# Allegro board 980XS-I6K51D-11120_placement.brd

Outline 581.66 x 429.26 mm; copper layers: TOP, L02_GND, L03_DPS, L04_GND, L05_DPS, L06_GND, L07_DPS, L08_GND, L09_DPS, L10_GND, L11_DPS, L12_GND, L13_SIGNAL, L14_GND, L15_SIGNAL, L16_GND, L17_SIGNAL, L18_GND, L19_SIGNAL, L20_GND, L21_SIGNAL, L22_GND, L23_SIGNAL, L24_GND, L25_SIGNAL, L26_GND, L27_SIGNAL, L28_GND, L29_SIGNAL, L30_GND, L31_SIGNAL, L32_GND, L33_SIGNAL, L34_GND, L35_DPS, L36_UDB, L37_GND, BOTTOM. Coordinates in mm from the lower left corner of the outline.
Outline path: 0,429.26 206.45,429.26 arc(217.17,423.61) 227.89,429.26 353.77,429.26 arc(364.49,423.61) 375.21,429.26 581.66,429.26 581.66,0 301.55,0 arc(290.83,5.65) 280.11,0 0,0 0,429.26

## Placement (name value [footprint] x y rotation side)
BD5  BD120-1.5A-S4-MU  [FB0402]  543.47 239.79 270 bottom
BD9  BD120-1.5A-S4-MU  [FB0402]  224.66 243.83 270 bottom
BD21  BD120-1.5A-S4-MU  [FB0402]  222.95 232.36 0 bottom
BD1721  BD120-1.5A-S4-MU  [FB0402]  543.47 226.84 270 bottom
BD1722  BD120-1.5A-S4-MU  [FB0402]  543.09 213.5 270 bottom
BD1723  BD120-1.5A-S4-MU  [FB0402]  543.09 199.41 270 bottom
BD1728  BD120-1.5A-S4-MU  [FB0402]  245.15 273.73 180 bottom
BDB5  BD120-1.5A-S4-MU  [FB0402]  232.36 264.33 270 bottom
BDB6  BD120-1.5A-S4-MU  [FB0402]  220.55 264.33 270 bottom
BDB7  BD120-1.5A-S4-MU  [FB0402]  211.03 234.89 0 bottom
BDB8  BD120-1.5A-S4-MU  [FB0402]  211.03 246.46 0 bottom
BGA293-9X7-P0.4  REF-CODE-SOCKET  [SOCKET_CODE]  284.21 469.34 0 top
C262  0.1U-16-X7S-S2-MU  [C0201]  224.41 232.06 270 bottom
C264  NC/10U-16-X7R-S8-SS  [C0805]  243.28 276.07 0 bottom
C267  33P-50-N-S2-MU  [C0201]  236.23 224.18 270 bottom
C268  33P-50-N-S2-MU  [C0201]  235.23 224.18 270 bottom
C271  12P-50-N-S4-MU  [C0402]  240.52 270.61 90 bottom
C272  12P-50-N-S4-MU  [C0402]  240.52 272.63 270 bottom
C278  1U-10-X7S-S4-TDK  [C0402]  232.87 293.11 0 bottom
C279  1U-10-X7S-S4-TDK  [C0402]  232.87 291.92 0 bottom
C280  0.1U-16-X-S4-MU  [C0402]  232.87 290.72 0 bottom
C281  0.1U-16-X-S4-MU  [C0402]  232.87 289.53 0 bottom
C282  1U-10-X7S-S4-TDK  [C0402]  238.7 286.48 270 bottom
C283  0.1U-16-X-S4-MU  [C0402]  237.54 286.48 270 bottom
C284  1U-10-X7S-S4-TDK  [C0402]  237.62 297.85 90 bottom
C285  0.1U-16-X-S4-MU  [C0402]  238.81 297.85 90 bottom
C286  0.1U-16-X-S4-MU  [C0402]  233.82 297.35 180 bottom
C288  1000P-50-X7R-S2-MU  [C0201]  233.49 295.57 270 bottom
C289  0.1U-16-X-S4-MU  [C0402]  231.21 294.81 270 bottom
C290  NC/0.1U-16-X7R-S4-TY  [C0402]  224.35 296.03 180 bottom
C298  0.1U-16-X7S-S2-MU  [C0201]  222.95 292.65 90 bottom
C299  0.1U-16-X7S-S2-MU  [C0201]  220.02 296.97 180 bottom
C300  0.1U-16-X-S4-MU  [C0402]  220.67 290.87 270 bottom
C301  1U-10-X7S-S4-TDK  [C0402]  219.51 290.87 270 bottom
C302  10P-50-N-S2-MU  [C0201]  229.27 260.38 270 bottom
C309  10P-50-N-S2-MU  [C0201]  241.08 260.38 270 bottom
C310  10P-50-N-S2-MU  [C0201]  241.08 261.68 90 bottom
C318  10P-50-N-S2-MU  [C0201]  241.08 263.42 270 bottom
C320  10P-50-N-S2-MU  [C0201]  229.27 261.68 90 bottom
C332  2.2U-16-X7R-S6-TY  [C0603]  109.1 226.65 270 bottom
C333  0.1U-16-X-S4-MU  [C0402]  107.7 226.83 270 bottom
C334  10U-16-X7R-S8-SS  [C0805]  100.08 226.53 90 bottom
C335  0.1U-16-X-S4-MU  [C0402]  101.74 226.35 90 bottom
C336  4.7U-25-X7R-S8-TY  [C0805]  87.58 240.29 270 bottom
C337  0.1U-16-X-S4-MU  [C0402]  87.6 237.74 180 bottom
C338  4.7U-25-X7R-S8-TY  [C0805]  106 240.29 270 bottom
C339  0.1U-16-X-S4-MU  [C0402]  106.03 237.74 180 bottom
C400  2.2U-10-X-S4-MU  [C0402]  540.94 239.82 90 bottom
C401  0.1U-16-X-S4-MU  [C0402]  542.2 239.82 90 bottom
C402  4.7U-6.3-X-S4-MU  [C0402]  523.51 152.12 0 bottom
C403  22U-16-X5R-SA-SS  [C1206]  520.12 149.58 90 bottom
C404  10U-25-X-S6-MU  [C0603]  519.86 146.58 180 bottom
C405  1U-10-X7S-S4-TDK  [C0402]  520.37 145.26 180 bottom
C406  0.1U-16-X-S4-MU  [C0402]  90.42 287.53 180 bottom
C407  2.2U-10-X-S4-MU  [C0402]  82.6 288.09 270 bottom
C408  0.1U-16-X-S4-MU  [C0402]  83.74 288.09 270 bottom
C409  0.1U-16-X-S4-MU  [C0402]  73.71 296.14 0 bottom
C410  0.1U-16-X-S4-MU  [C0402]  508.66 225.73 270 bottom
C411  0.1U-16-X-S4-MU  [C0402]  498.63 233.78 0 bottom
C412  2.2U-10-X-S4-MU  [C0402]  507.51 225.73 270 bottom
C413  0.1U-16-X-S4-MU  [C0402]  515.33 225.16 180 bottom
C415  0.1U-16-X-S4-MU  [C0402]  90.42 273.81 180 bottom
C416  2.2U-10-X-S4-MU  [C0402]  82.6 274.38 270 bottom
C417  0.1U-16-X-S4-MU  [C0402]  73.71 282.43 0 bottom
C475  4.7U-6.3-X-S4-MU  [C0402]  256.72 272.09 270 bottom
C476  1U-10-X7S-S4-TDK  [C0402]  249.86 275.23 90 bottom
C477  10U-25-X-S6-MU  [C0603]  251.18 275.74 90 bottom
C478  22U-16-X5R-SA-SS  [C1206]  254.18 275.49 0 bottom
C894  0.1U-16-X-S4-MU  [C0402]  542.2 226.87 90 bottom
C895  2.2U-10-X-S4-MU  [C0402]  540.94 226.87 90 bottom
C910  0.1U-16-X-S4-MU  [C0402]  83.74 274.38 270 bottom
C922  0.1U-16-X-S4-MU  [C0402]  232.36 262.2 270 bottom
C923  0.1U-16-X-S4-MU  [C0402]  220.55 262.2 270 bottom
C924  10P-50-N-S2-MU  [C0201]  229.27 263.42 270 bottom
C955  0.1U-16-X-S4-MU  [C0402]  90.42 260.1 180 bottom
C956  2.2U-10-X-S4-MU  [C0402]  82.6 260.66 270 bottom
C957  0.1U-16-X-S4-MU  [C0402]  73.71 268.71 0 bottom
C958  0.1U-16-X-S4-MU  [C0402]  83.74 260.66 270 bottom
C983  0.1U-16-X-S4-MU  [C0402]  541.82 213.53 90 bottom
C984  2.2U-10-X-S4-MU  [C0402]  540.55 213.53 90 bottom
C985  0.1U-16-X-S4-MU  [C0402]  541.82 199.44 90 bottom
C986  2.2U-10-X-S4-MU  [C0402]  540.55 199.44 90 bottom
C1074  0.1U-16-X7S-S2-MU  [C0201_MINI]  243.6 273.98 90 bottom
C1082  0.1U-16-X-S4-MU  [C0402]  508.66 207.57 270 bottom
C1083  0.1U-16-X-S4-MU  [C0402]  248.15 224.79 0 bottom
C1085  2.2U-10-X-S4-MU  [C0402]  498.63 215.62 0 bottom
C1086  10P-50-N-S2-MU  [C0201]  214.98 255.18 0 bottom
C1087  10P-50-N-S2-MU  [C0201]  213.69 255.18 180 bottom
C1088  10P-50-N-S2-MU  [C0201]  211.94 255.18 0 bottom
C1089  0.1U-16-X-S4-MU  [C0402]  213.16 234.89 0 bottom
C1090  0.1U-16-X-S4-MU  [C0402]  213.16 246.46 0 bottom
C1091  10P-50-N-S2-MU  [C0201]  213.69 243.61 180 bottom
C1093  10P-50-N-S2-MU  [C0201]  214.98 243.61 0 bottom
CA1  0.1U-16-X-S4-MU  [C0402]  205.72 237.49 0 bottom
CA2  10U-25-X7R-SA  [C1206]  205.72 240.03 0 bottom
CA7  10U-25-X7R-SA  [C1206]  245.12 285.5 0 bottom
CA8  0.1U-16-X-S4-MU  [C0402]  245.12 283.46 0 bottom
CA19  470U-25-E-S10.4X10.4  [EC_10P3X10_S]  189.66 230.89 90 bottom
CA20  10U-25-X7R-SA  [C1206]  216.67 285.5 0 bottom
CA21  0.1U-16-X-S4-MU  [C0402]  216.67 283.46 0 bottom
CA22  10U-25-X7R-SA  [C1206]  222.76 281.43 0 bottom
CA23  0.1U-16-X-S4-MU  [C0402]  222.76 279.4 0 bottom
CA24  10U-25-X7R-SA  [C1206]  216.67 281.43 0 bottom
CA25  0.1U-16-X-S4-MU  [C0402]  216.67 279.4 0 bottom
CA26  10U-25-X7R-SA  [C1206]  235.18 281.43 0 bottom
CA27  0.1U-16-X-S4-MU  [C0402]  235.18 279.4 0 bottom
CA34  10U-25-X7R-SA  [C1206]  245.12 281.43 0 bottom
CA35  0.1U-16-X-S4-MU  [C0402]  245.12 279.4 0 bottom
CA36  0.1U-16-X-S4-MU  [C0402]  228.85 279.4 0 bottom
CA37  10U-25-X7R-SA  [C1206]  228.85 281.43 0 bottom
CA38  10U-25-X7R-SA  [C1206]  188.01 283.69 0 top
CA39  0.1U-16-X-S4-MU  [C0402]  206.26 242.54 0 top
CB1  0.1U-25-X-S6  [C0603]  416.81 133.35 0 bottom
CB2  10U-25-X7R-SA  [C1206]  416.81 130.81 0 bottom
CB3  0.1U-25-X-S6  [C0603]  560.07 133.35 0 bottom
CB4  10U-25-X7R-SA  [C1206]  560.07 130.81 0 bottom
CB5  0.1U-25-X-S6  [C0603]  560.07 295.91 180 bottom
CB6  10U-25-X7R-SA  [C1206]  560.07 298.45 180 bottom
CB7  0.1U-25-X-S6  [C0603]  424.16 290.83 180 bottom
CB8  10U-25-X7R-SA  [C1206]  424.16 293.37 180 bottom
CB9  0.1U-25-X-S6  [C0603]  164.85 133.35 0 bottom
CB10  10U-25-X7R-SA  [C1206]  164.85 130.81 0 bottom
CB11  0.1U-25-X-S6  [C0603]  157.46 290.83 180 bottom
CB12  10U-25-X7R-SA  [C1206]  157.46 293.37 180 bottom
CB13  0.1U-25-X-S6  [C0603]  21.59 133.35 0 bottom
CB14  10U-25-X7R-SA  [C1206]  21.59 130.81 0 bottom
CB15  0.1U-25-X-S6  [C0603]  21.59 295.91 180 bottom
CB16  10U-25-X7R-SA  [C1206]  21.59 298.45 180 bottom
CC1  0.1U-16-X7S-S2-MU  [C0201_MINI]  230.19 246.91 180 bottom
CC2  0.1U-16-X7S-S2-MU  [C0201_MINI]  230.5 250.48 90 bottom
CC3  0.1U-16-X7S-S2-MU  [C0201_MINI]  228.87 245.61 180 bottom
CC4  0.1U-16-X7S-S2-MU  [C0201_MINI]  230.19 246.38 180 bottom
CC5  0.1U-16-X7S-S2-MU  [C0201_MINI]  231.16 246.56 90 bottom
CC6  0.1U-16-X7S-S2-MU  [C0201_MINI]  228.87 244.96 180 bottom
CC7  0.1U-16-X7S-S2-MU  [C0201_MINI]  232.14 244.96 0 bottom
CC8  0.1U-16-X7S-S2-MU  [C0201_MINI]  230.5 243.97 270 bottom
CC9  0.1U-16-X7S-S2-MU  [C0201_MINI]  231.16 243.97 270 bottom
CC12  0.1U-16-X7S-S2-MU  [C0201_MINI]  229.86 244.62 270 bottom
CC13  0.1U-16-X7S-S2-MU  [C0201_MINI]  228.24 241.05 180 bottom
CC14  0.1U-16-X7S-S2-MU  [C0201_MINI]  231.46 245.61 0 bottom
CC15  0.1U-16-X7S-S2-MU  [C0201_MINI]  230.19 245.61 180 bottom
CC16  0.1U-16-X7S-S2-MU  [C0201_MINI]  230.84 244.96 180 bottom
CC70  0.1U-16-X7S-S2-MU  [C0201_MINI]  232.46 242.67 270 bottom
CC71  0.1U-16-X7S-S2-MU  [C0201_MINI]  235.38 243 0 bottom
CC73  0.1U-16-X7S-S2-MU  [C0201_MINI]  227.91 242.68 90 bottom
CC84  0.1U-16-X7S-S2-MU  [C0201_MINI]  233.11 250.48 90 bottom
CC85  0.1U-16-X7S-S2-MU  [C0201_MINI]  231.15 250.48 90 bottom
CC86  0.1U-16-X7S-S2-MU  [C0201_MINI]  232.46 250.48 90 bottom
CC87  0.1U-16-X7S-S2-MU  [C0201_MINI]  232.14 246.26 180 bottom
CC88  0.1U-16-X7S-S2-MU  [C0201_MINI]  233.11 244 270 bottom
CC89  0.1U-16-X7S-S2-MU  [C0201_MINI]  227.91 244.66 270 bottom
CC90  0.1U-16-X7S-S2-MU  [C0201_MINI]  231.8 250.48 90 bottom
CC91  0.1U-16-X7S-S2-MU  [C0201_MINI]  234.06 243.65 0 bottom
CC92  0.1U-16-X7S-S2-MU  [C0201_MINI]  232.45 244 270 bottom
CC96  0.1U-16-X7S-S2-MU  [C0201_MINI]  229.22 246.41 180 bottom
CC101  0.1U-16-X7S-S2-MU  [C0201_MINI]  230.84 240.4 0 bottom
CC103  0.1U-16-X7S-S2-MU  [C0201_MINI]  231.81 242.02 90 bottom
CC105  0.1U-16-X7S-S2-MU  [C0201_MINI]  232.46 240.72 270 bottom
CC112  0.1U-16-X7S-S2-MU  [C0201_MINI]  235.06 250.48 90 bottom
CC130  0.1U-16-X7S-S2-MU  [C0201_MINI]  228.24 241.7 180 bottom
CC182  0.1U-16-X7S-S2-MU  [C0201_MINI]  226.61 250.48 90 bottom
CC195  4.7U-25-X7R-S8-TY  [C0805]  187.38 280.77 0 top
CC202  0.1U-16-X7S-S2-MU  [C0201_MINI]  226.28 245.61 180 bottom
CC211  0.1U-16-X7S-S2-MU  [C0201_MINI]  230.5 242.02 90 bottom
CC212  0.1U-16-X7S-S2-MU  [C0201_MINI]  229.53 241.06 180 bottom
CC213  0.1U-16-X7S-S2-MU  [C0201_MINI]  231.16 242.02 90 bottom
CC214  0.1U-16-X7S-S2-MU  [C0201_MINI]  192.95 287.28 90 top
CC215  0.1U-16-X7S-S2-MU  [C0201_MINI]  231.81 239.42 90 bottom
CC216  0.1U-16-X7S-S2-MU  [C0201_MINI]  228.56 238.78 270 bottom
CC217  0.1U-16-X7S-S2-MU  [C0201_MINI]  194.35 287.28 90 top
CC218  0.1U-16-X7S-S2-MU  [C0201_MINI]  195.75 287.28 90 top
CC219  0.1U-16-X7S-S2-MU  [C0201_MINI]  197.15 287.28 90 top
CC220  0.1U-16-X7S-S2-MU  [C0201_MINI]  198.56 287.28 90 top
CON1  MS-PWR-CONN-30P-V3-SI6D70  [CONN_15X2_100MIL_PH_MS_V2]  24.74 150.36 90 top
CSDPS303  V93K_CSDPS_DPS32  [PG_VG93K_PF_DPS32_G1D303]  327.66 46.99 0 top
CSDPS307  V93K_CSDPS_DPS32  [PG_VG93K_PF_DPS32_G1D307]  401.32 46.99 0 top
CSDPS310  V93K_CSDPS_DPS32  [PG_VG93K_PF_DPS32_G2D310]  401.32 361.95 0 top
CSDPS314  V93K_CSDPS_DPS32  [PG_VG93K_PF_DPS32_G2D314]  327.66 361.95 0 top
CSDPS319  V93K_CSDPS_DPS32  [PG_VG93K_PF_DPS32_G3D319]  180.34 46.99 0 top
CSDPS323  V93K_CSDPS_DPS32  [PG_VG93K_PF_DPS32_G3D323]  254 46.99 0 top
CSDPS426  V93K_CSDPS  [PG_VG93K_PF_DPS32_G8D426]  254 361.95 0 top
CSDPS430  V93K_CSDPS  [PG_VG93K_PF_DPS32_G8D430]  180.34 361.95 0 top
D101  V93K_CH  [PG_VG93K_F_G1D101]  327.66 97.79 0 top
D102  V93K_CH  [PG_VG93K_F_G1D102]  327.66 77.47 0 top
D103  V93K_CH  [PG_VG93K_F_G1D103]  327.66 57.15 0 top
D104  V93K_CH  [PG_VG93K_F_G1D104]  327.66 36.83 0 top
D105  V93K_CH  [PG_VG93K_F_G1D105]  401.32 97.79 0 top
D106  V93K_CH  [PG_VG93K_F_G1D106]  401.32 77.47 0 top
D107  V93K_CH  [PG_VG93K_F_G1D107]  401.32 57.15 0 top
D108  V93K_CH  [PG_VG93K_F_G1D108]  401.32 36.83 0 top
D109  V93K_CH  [PG_VG93K_F_G2D109]  401.32 331.47 0 top
D110  V93K_CH  [PG_VG93K_F_G2D110]  401.32 351.79 0 top
D111  V93K_CH  [PG_VG93K_F_G2D111]  401.32 372.11 0 top
D112  V93K_CH  [PG_VG93K_F_G2D112]  401.32 392.43 0 top
D113  V93K_CH  [PG_VG93K_F_G2D113]  327.66 331.47 0 top
D114  V93K_CH  [PG_VG93K_F_G2D114]  327.66 351.79 0 top
D115  V93K_CH  [PG_VG93K_F_G2D115]  327.66 372.11 0 top
D116  V93K_CH  [PG_VG93K_F_G2D116]  327.66 392.43 0 top
D117  V93K_CH  [PG_VG93K_F_G3D117]  180.34 97.79 0 top
D118  V93K_CH  [PG_VG93K_F_G3D118]  180.34 77.47 0 top
D119  V93K_CH  [PG_VG93K_F_G3D119]  180.34 57.15 0 top
D120  V93K_CH  [PG_VG93K_F_G3D120]  180.34 36.83 0 top
D121  V93K_CH  [PG_VG93K_F_G3D121]  254 97.79 0 top
D122  V93K_CH  [PG_VG93K_F_G3D122]  254 77.47 0 top
D123  V93K_CH  [PG_VG93K_F_G3D123]  254 57.15 0 top
D124  V93K_CH  [PG_VG93K_F_G3D124]  254 36.83 0 top
D125  V93K_CH  [PG_VG93K_F_G4D125]  33.02 97.79 0 top
D126  V93K_CH  [PG_VG93K_F_G4D126]  33.02 77.47 0 top
D127  V93K_CH  [PG_VG93K_F_G4D127]  33.02 57.15 0 top
D128  V93K_CH  [PG_VG93K_F_G4D128]  33.02 36.83 0 top
D129  V93K_CH  [PG_VG93K_F_G4D129]  106.68 97.79 0 top
D130  V93K_CH  [PG_VG93K_F_G4D130]  106.68 77.47 0 top
D131  V93K_CH  [PG_VG93K_F_G4D131]  106.68 57.15 0 top
D132  V93K_CH  [PG_VG93K_F_G4D132]  106.68 36.83 0 top
D201  V93K_CH  [PG_VG93K_F_G5D201]  474.98 97.79 0 top
D202  V93K_CH  [PG_VG93K_F_G5D202]  474.98 77.47 0 top
D203  V93K_CH  [PG_VG93K_F_G5D203]  474.98 57.15 0 top
D204  V93K_CH  [PG_VG93K_F_G5D204]  474.98 36.83 0 top
D205  V93K_CH  [PG_VG93K_F_G5D205]  548.64 97.79 0 top
D206  V93K_CH  [PG_VG93K_F_G5D206]  548.64 77.47 0 top
D207  V93K_CH  [PG_VG93K_F_G5D207]  548.64 57.15 0 top
D208  V93K_CH  [PG_VG93K_F_G5D208]  548.64 36.83 0 top
D209  V93K_CH  [PG_VG93K_F_G6D209]  548.64 331.47 0 top
D210  V93K_CH  [PG_VG93K_F_G6D210]  548.64 351.79 0 top
D211  V93K_CH  [PG_VG93K_F_G6D211]  548.64 372.11 0 top
D212  V93K_CH  [PG_VG93K_F_G6D212]  548.64 392.43 0 top
D213  V93K_CH  [PG_VG93K_F_G6D213]  474.98 331.47 0 top
D214  V93K_CH  [PG_VG93K_F_G6D214]  474.98 351.79 0 top
D215  V93K_CH  [PG_VG93K_F_G6D215]  474.98 372.11 0 top
D216  V93K_CH  [PG_VG93K_F_G6D216]  474.98 392.43 0 top
D217  V93K_CH  [PG_VG93K_F_G7D217]  106.68 331.47 0 top
D218  V93K_CH  [PG_VG93K_F_G7D218]  106.68 351.79 0 top
D219  V93K_CH  [PG_VG93K_F_G7D219]  106.68 372.11 0 top
D220  V93K_CH  [PG_VG93K_F_G7D220]  106.68 392.43 0 top
D221  V93K_CH  [PG_VG93K_F_G7D221]  33.02 331.47 0 top
D222  V93K_CH  [PG_VG93K_F_G7D222]  33.02 351.79 0 top
D223  V93K_CH  [PG_VG93K_F_G7D223]  33.02 372.11 0 top
D224  V93K_CH  [PG_VG93K_F_G7D224]  33.02 392.43 0 top
D225  V93K_CH_ND  [PG_VG93K_F_G8D225_ND]  254 331.47 0 top
D226/D626  V93K_PS1600 HD  [PG_VG93K_F_HSM_G8D226_626_ND]  254 351.79 0 top
D227  V93K_CH  [PG_VG93K_F_G8D227]  254 372.11 0 top
D228  V93K_CH  [PG_VG93K_F_G8D228]  254 392.43 0 top
D229  V93K_CH_ND  [PG_VG93K_F_G8D229_ND]  180.34 331.47 0 top
D230/D630  V93K_PS1600 HD  [PG_VG93K_F_HSM_G8D230_630_ND]  180.34 351.79 0 top
D231  V93K_CH  [PG_VG93K_F_G8D231]  180.34 372.11 0 top
D232  V93K_CH  [PG_VG93K_F_G8D232]  180.34 392.43 0 top
D325  V93K_CH  [PG_VG93K_F_G4D325]  33.02 87.63 0 top
D326  V93K_CH  [PG_VG93K_F_G4D326]  33.02 67.31 0 top
D327  V93K_CH  [PG_VG93K_F_G4D327]  33.02 46.99 0 top
D328  V93K_CH  [PG_VG93K_F_G4D328]  33.02 26.67 0 top
D329  V93K_CH  [PG_VG93K_F_G4D329]  106.68 87.63 0 top
D330  V93K_CH  [PG_VG93K_F_G4D330]  106.68 67.31 0 top
D331  V93K_CH  [PG_VG93K_F_G4D331]  106.68 46.99 0 top
D332  V93K_CH  [PG_VG93K_F_G4D332]  106.68 26.67 0 top
D409  V93K_CH  [PG_VG93K_F_G6D409]  548.64 341.63 0 top
D410  V93K_CH  [PG_VG93K_F_G6D410]  548.64 361.95 0 top
D411  V93K_CH  [PG_VG93K_F_G6D411]  548.64 382.27 0 top
D412  V93K_CH  [PG_VG93K_F_G6D412]  548.64 402.59 0 top
D413  V93K_CH  [PG_VG93K_F_G6D413]  474.98 341.63 0 top
D414  V93K_CH  [PG_VG93K_F_G6D414]  474.98 361.95 0 top
D415  V93K_CH  [PG_VG93K_F_G6D415]  474.98 382.27 0 top
D416  V93K_CH  [PG_VG93K_F_G6D416]  474.98 402.59 0 top
D417  V93K_CH  [PG_VG93K_F_G7D417]  106.68 341.63 0 top
D418  V93K_CH  [PG_VG93K_F_G7D418]  106.68 361.95 0 top
D419  V93K_CH  [PG_VG93K_F_G7D419]  106.68 382.27 0 top
D420  V93K_CH  [PG_VG93K_F_G7D420]  106.68 402.59 0 top
D421  V93K_CH  [PG_VG93K_F_G7D421]  33.02 341.63 0 top
D422  V93K_CH  [PG_VG93K_F_G7D422]  33.02 361.95 0 top
D423  V93K_CH  [PG_VG93K_F_G7D423]  33.02 382.27 0 top
D424  V93K_CH  [PG_VG93K_F_G7D424]  33.02 402.59 0 top
D425  V93K_CH_ND  [PG_VG93K_F_G8D425_ND]  254 341.63 0 top
D427  V93K_CH  [PG_VG93K_F_G8D427]  254 382.27 0 top
D428  V93K_CH  [PG_VG93K_F_G8D428]  254 402.59 0 top
D429  V93K_CH_ND  [PG_VG93K_F_G8D429_ND]  180.34 341.63 0 top
D431  V93K_CH  [PG_VG93K_F_G8D431]  180.34 382.27 0 top
D432  V93K_CH  [PG_VG93K_F_G8D432]  180.34 402.59 0 top
DPS1  V93K_DPS  [PG_VG93K_F_G1DPS1]  401.32 16.51 0 top
DPS2  V93K_DPS  [PG_VG93K_F_G2DPS2]  327.66 412.75 0 top
DPS3  V93K_DPS  [PG_VG93K_F_G3DPS3]  254 16.51 0 top
DPS8  V93K_DPS  [PG_VG93K_F_G8DPS8]  180.34 412.75 0 top
FD1  -  [FD_040_V2]  10.16 129.54 0 top
FD2  -  [FD_040_V2]  11.43 298.45 0 top
FD3  -  [FD_040_V2]  157.48 298.45 0 top
FD4  -  [FD_040_V2]  157.48 130.81 0 top
FD5  -  [FD_040_V2]  424.18 298.45 0 top
FD6  -  [FD_040_V2]  424.18 130.81 0 top
FD7  -  [FD_040_V2]  570.23 298.45 0 top
FD8  -  [FD_040_V2]  570.23 130.81 0 top
FD9  -  [FD_040_V2]  10.16 129.54 180 bottom
FD10  -  [FD_040_V2]  11.43 298.45 180 bottom
FD11  -  [FD_040_V2]  157.48 298.45 180 bottom
FD12  -  [FD_040_V2]  157.48 130.81 180 bottom
FD13  -  [FD_040_V2]  424.18 298.45 180 bottom
FD14  -  [FD_040_V2]  424.18 130.81 180 bottom
FD15  -  [FD_040_V2]  570.23 298.45 180 bottom
FD16  -  [FD_040_V2]  570.23 130.81 180 bottom
H1  M3-HOLE  [M3_NPTH169]  158.75 241.3 0 top
H2  M3-HOLE  [M3_NPTH169]  158.75 187.96 0 top
H3  M3-HOLE  [M3_NPTH169]  422.91 241.3 0 top
H4  M3-HOLE  [M3_NPTH169]  422.91 187.96 0 top
J1  HDR-2X1-M  [JP_2P_100]  10.78 152.9 180 top
J2  HDR-2X1-M  [JP_2P_100]  14.16 152.9 180 top
JG261002WW011  REF-CODE-SOCKET  [SOCKET_CODE]  284.82 469.34 0 top
JP1  A2001WV0-4PS_V2  [CONN_S4X1_2MM_JWT]  100.37 260.08 90 top
K2  UA2-5NJ-A-V3  [RL_NECUA2_5V_V3]  119.04 248.1 90 bottom
K3  UA2-5NJ-A-V3  [RL_NECUA2_5V_V3]  112.69 248.1 90 bottom
K4  UA2-5NJ-A-V3  [RL_NECUA2_5V_V3]  106.34 248.1 90 bottom
K5  UA2-5NJ-A-V3  [RL_NECUA2_5V_V3]  99.99 248.1 90 bottom
K6  UA2-5NJ-A-V3  [RL_NECUA2_5V_V3]  93.64 248.1 90 bottom
K7  UA2-5NJ-A-V3  [RL_NECUA2_5V_V3]  87.29 248.1 90 bottom
K29  G6K-2F-Y-5V-A  [RL_G6K2F-Y_5V_OMRON]  231.89 271.62 0 bottom
K32  G6K-2F-Y-5V-A  [RL_G6K2F-Y_5V_OMRON]  235.73 231.79 270 bottom
K34  G6K-2P-Y5VDC-A  [RL_OMRONG6K2PY_5V]  166.88 269.24 90 bottom
K96  EC2-5NJ  [RL_NECEC2_10P_5V]  203.76 229.39 0 bottom
K109  G6K-2P-Y5VDC-A  [RL_OMRONG6K2PY_5V]  166.88 293.62 90 bottom
K110  G6K-2P-Y5VDC-A  [RL_OMRONG6K2PY_5V]  176.53 293.62 90 bottom
LDB1  LDG-2-S8  [LED_0805]  40.96 298.45 0 top
LOGO1  LOGO_SR_SigmaStar  [LOGO_SR_SIGMASTAR]  29.16 434.98 0 top
LOGO2  -  [LOGO_KT_KSMT]  81.21 434.37 0 top
LRB1  330-1-S6  [R0603]  42.89 298.45 180 bottom
MBD1  BD120-1.5A-S4-MU  [FB0402]  222.95 294.3 270 bottom
MK1  AQY221R2MY-V2  [RL_AQY221R2MY_5V_V2]  225.87 288.33 180 bottom
MK2  AQY221R2MY-V2  [RL_AQY221R2MY_5V_V2]  225.87 293.67 180 bottom
MK3  AQY221R2MY-V2  [RL_AQY221R2MY_5V_V2]  225.87 285.79 180 bottom
MK4  AQY221R2MY-V2  [RL_AQY221R2MY_5V_V2]  225.87 291 180 bottom
MR1  1M-1-S4  [R0402_UNBGA_V2]  236.22 286.48 270 bottom
MR2  1K-0.01-S4  [R0402_UNBGA_V2]  235.91 297.35 180 bottom
MR3  1K-0.01-S4  [R0402_UNBGA_V2]  233.82 298.37 180 bottom
MR4  1K-0.01-S4  [R0402_UNBGA_V2]  233.82 299.38 180 bottom
MR5  1K-0.01-S4  [R0402_UNBGA_V2]  235.91 299.38 0 bottom
MR6  1K-0.01-S4  [R0402_UNBGA_V2]  235.91 298.37 0 bottom
MR7  332K-1-S4  [R0402_UNBGA_V2]  235.21 285.63 90 bottom
MR8  1K-0.01-S4  [R0402_UNBGA_V2]  224.35 299.38 180 bottom
MR9  499-0.1-S4  [R0402]  224.35 298.27 180 bottom
MR10  0-5-S4  [R0402]  224.35 297.15 0 bottom
MR11  750-1-S4  [R0402]  229.3 288.97 180 bottom
MR12  360-1-S6  [R0603]  229.68 287.7 180 bottom
MR13  750-1-S4  [R0402]  229.3 294.3 180 bottom
MR14  1.2K-1-S4  [R0402]  229.05 286.43 0 bottom
MR15  360-1-S6  [R0603]  229.68 293.03 180 bottom
MR16  750-1-S4  [R0402]  229.3 291.64 180 bottom
MR17  360-1-S6  [R0603]  229.68 290.37 180 bottom
MR18  11K-0.1-S4  [R0402]  221.81 290.87 270 bottom
MR19  1K-0.01-S4  [R0402_UNBGA_V2]  222.95 290.87 90 bottom
MU1  KSMT002-0.15A-A-SC70-5  [SC70_5P]  233.15 287.63 90 bottom
MU2  KSMT004-SO8  [SO8_244X127MM]  238.06 292.02 90 bottom
MU3  KSMT003-MSOP8  [SO8_172X0P65MM]  228.92 297.48 180 bottom
MU4  MAX6070AAUT30+T-SOT23  [SOT23_6P_0P95X2P7MM_H1P45MM]  220.67 294.3 0 bottom
NOREF  -  []  117.24 249.7 0 top
NOREF#2  -  []  274.75 286.43 0 top
NOREF#3  -  []  229.27 263.12 90 top
NOREF#4  -  []  241.48 268.37 0 top
NOREF#5  -  []  225.33 134.7 0 top
NOREF#6  -  []  310.59 240.4 0 top
NOREF#7  -  []  267.65 200.55 90 top
NOREF#8  -  []  356.7 297.74 0 top
NOREF#9  -  []  111.99 220.75 0 top
NOREF#10  -  []  79.1 264.51 0 top
NOREF#11  -  []  302.49 297.25 90 top
NOREF#12  -  []  353.1 190.23 90 top
NOREF#13  -  []  321.48 268.37 0 top
NOREF#14  -  []  346.03 245.61 0 top
NOREF#15  -  []  275.64 200.94 0 top
NOREF#16  -  []  211.64 255.18 0 top
NOREF#17  -  []  308.62 185.61 0 top
NOREF#18  -  []  493.92 238.07 0 top
NOREF#19  -  []  563.28 170.72 90 top
NOREF#20  -  []  487.59 201.13 90 top
NOREF#21  -  []  475.32 237.42 90 top
NOREF#22  -  []  56.85 250.69 0 top
NOREF#23  -  []  363.33 212.85 90 top
NOREF#24  -  []  350.59 244.96 0 top
NOREF#25  -  []  348.31 202.82 0 top
NOREF#26  -  []  307.95 203.03 0 top
NOREF#27  -  []  249.83 203.63 90 top
NOREF#28  -  []  283.36 212.69 0 top
NOREF#29  -  []  90.89 214.75 90 top
NOREF#30  -  []  352.23 167.99 0 top
NOREF#31  -  []  231.8 190.23 90 top
NOREF#32  -  []  351.88 244.88 90 top
NOREF#33  -  []  231.48 246.14 90 top
NOREF#34  -  []  282.68 212.85 0 top
NOREF#35  -  []  547.86 198.36 0 top
NOREF#36  -  []  226.91 141.04 90 top
NOREF#37  -  []  274.95 242.76 0 top
NOREF#38  -  []  310.74 241.59 0 top
NOREF#39  -  []  534.31 232.71 0 top
NOREF#40  -  []  352.04 190.05 0 top
NOREF#41  -  []  488.08 221.76 0 top
NOREF#42  -  []  268.67 241.94 0 top
NOREF#43  -  []  231.48 245.37 90 top
NOREF#44  -  []  87.91 233.68 90 top
NOREF#45  -  []  267.95 261.38 0 top
NOREF#46  -  []  480.26 179.13 0 top
NOREF#47  -  []  101.59 219.95 0 top
NOREF#48  -  []  351.48 186.67 90 top
NOREF#49  -  []  306.41 194.4 90 top
NOREF#50  -  []  227 199.15 0 top
NOREF#51  -  []  346.56 259.8 0 top
NOREF#52  -  []  487.13 218.56 90 top
NOREF#53  -  []  330.61 247.17 90 top
NOREF#54  -  []  266.63 247.43 0 top
NOREF#55  -  []  214.36 183.2 0 top
NOREF#56  -  []  473.18 158.26 0 top
NOREF#57  -  []  345.03 261.06 0 top
NOREF#58  -  []  229.94 186.26 0 top
NOREF#59  -  []  353.43 246.02 90 top
NOREF#60  -  []  86.2 277.28 90 top
NOREF#61  -  []  306.63 247.43 0 top
NOREF#62  -  []  549.06 210.41 90 top
NOREF#63  -  []  276.89 133.69 0 top
NOREF#64  -  []  254.2 269.34 90 top
NOREF#65  -  []  92.33 133.71 90 top
NOREF#66  -  []  311.8 190.23 90 top
NOREF#67  -  []  497.61 212.49 0 top
NOREF#68  -  []  232.57 186.5 0 top
NOREF#69  -  []  268.62 185.61 0 top
NOREF#70  -  []  352.23 232.39 90 top
NOREF#71  -  []  294.36 241.55 0 top
NOREF#72  -  []  313.81 243.65 0 top
NOREF#73  -  []  274.21 189.57 90 top
NOREF#74  -  []  229.61 245.05 0 top
NOREF#75  -  []  64.97 271.72 90 top
NOREF#76  -  []  224.52 293.03 90 top
NOREF#77  -  []  311.4 186.13 0 top
NOREF#78  -  []  307.9 182.43 90 top
NOREF#79  -  []  83.29 186.2 0 top
NOREF#80  -  []  233.02 194.4 0 top
NOREF#81  -  []  90.33 162.11 0 top
NOREF#82  -  []  359.77 260.68 0 top
NOREF#83  -  []  273.08 180.67 90 top
NOREF#84  -  []  534.61 221.48 0 top
NOREF#85  -  []  268.09 208.12 0 top
NOREF#86  -  []  276.16 249.57 90 top
NOREF#87  -  []  116.75 229.07 90 top
NOREF#88  -  []  473.22 176.78 0 top
NOREF#89  -  []  251.96 253.56 90 top
NOREF#90  -  []  495.12 144.71 90 top
NOREF#91  -  []  280.79 213.43 0 top
NOREF#92  -  []  80.24 220.75 0 top
NOREF#93  -  []  312.8 187.32 90 top
NOREF#94  -  []  542.34 236.63 90 top
NOREF#95  -  []  232.05 238.99 0 top
NOREF#96  -  []  349.61 245.05 0 top
NOREF#97  -  []  292.33 193.86 90 top
NOREF#98  -  []  314.75 285.63 90 top
NOREF#99  -  []  351.02 245.37 0 top
NOREF#100  -  []  235.13 243 0 top
NOREF#101  -  []  97.76 197.61 0 top
NOREF#102  -  []  113.09 249.7 0 top
NOREF#103  -  []  269.53 181.46 90 top
NOREF#104  -  []  473.2 133.68 90 top
NOREF#105  -  []  341.81 264.2 0 top
NOREF#106  -  []  285.64 136.62 90 top
NOREF#107  -  []  267.21 199.8 90 top
NOREF#108  -  []  470.13 161.06 0 top
NOREF#109  -  []  80.24 157.25 0 top
NOREF#110  -  []  115.04 186.2 0 top
NOREF#111  -  []  281.48 208.37 0 top
NOREF#112  -  []  303.09 173.82 0 top
NOREF#113  -  []  227 260.55 0 top
NOREF#114  -  []  334.68 255.18 0 top
NOREF#115  -  []  307.95 263.72 0 top
NOREF#116  -  []  197.15 283.09 90 top
NOREF#117  -  []  495.12 142.17 90 top
NOREF#118  -  []  316.23 163.88 90 top
NOREF#119  -  []  252.96 194.76 0 top
NOREF#120  -  []  86.2 265.01 90 top
NOREF#121  -  []  473.22 174.24 0 top
NOREF#122  -  []  308.62 244.96 0 top
NOREF#123  -  []  351.78 243.92 90 top
NOREF#124  -  []  251.16 247.72 90 top
NOREF#125  -  []  224.78 202.58 0 top
NOREF#126  -  []  48.35 268.47 0 top
NOREF#127  -  []  83.29 217.95 0 top
NOREF#128  -  []  87.69 249.7 0 top
NOREF#129  -  []  333.29 253.86 90 top
NOREF#130  -  []  347.95 200.68 0 top
NOREF#131  -  []  267.95 260.68 0 top
NOREF#132  -  []  493.92 206.32 0 top
NOREF#133  -  []  369.83 203.63 90 top
NOREF#134  -  []  307.65 262.2 90 top
NOREF#135  -  []  273.07 194.55 0 top
NOREF#136  -  []  335.16 251.22 90 top
NOREF#137  -  []  40.23 254.72 0 top
NOREF#138  -  []  349.28 241.06 0 top
NOREF#139  -  []  311.81 181.77 90 top
NOREF#140  -  []  309.94 245.61 0 top
NOREF#141  -  []  264.96 136.11 90 top
NOREF#142  -  []  269.94 246.91 0 top
NOREF#143  -  []  269.28 181.06 0 top
NOREF#144  -  []  478.69 134.36 90 top
NOREF#145  -  []  348.01 173.3 90 top
NOREF#146  -  []  293.09 194.86 90 top
NOREF#147  -  []  85 293.09 0 top
NOREF#148  -  []  548.24 225.79 0 top
NOREF#149  -  []  343.95 173.34 90 top
NOREF#150  -  []  347.05 135.09 90 top
NOREF#151  -  []  350.91 184.4 0 top
NOREF#152  -  []  319.47 261.5 90 top
NOREF#153  -  []  215.71 193.56 90 top
NOREF#154  -  []  309.96 181.3 0 top
NOREF#155  -  []  114.29 188.2 0 top
NOREF#156  -  []  111.42 159.47 0 top
NOREF#157  -  []  473.22 205.99 0 top
NOREF#158  -  []  308.09 268.12 0 top
NOREF#159  -  []  349.53 241.46 90 top
NOREF#160  -  []  361.44 213.43 90 top
NOREF#161  -  []  236.7 296.96 90 top
NOREF#162  -  []  533.93 205.02 0 top
NOREF#163  -  []  265.48 173.73 90 top
NOREF#164  -  []  318.82 200.55 0 top
NOREF#165  -  []  307 261.5 0 top
NOREF#166  -  []  238.71 141.78 90 top
NOREF#167  -  []  468.83 224.41 90 top
NOREF#168  -  []  224.47 291.41 90 top
NOREF#169  -  []  104.66 130.4 0 top
NOREF#170  -  []  193.07 255.02 90 top
NOREF#171  -  []  522.5 149.61 0 top
NOREF#172  -  []  231.61 249.57 90 top
NOREF#173  -  []  309.11 233.64 90 top
NOREF#174  -  []  291.96 253.56 90 top
NOREF#175  -  []  549.44 236.7 90 top
NOREF#176  -  []  211.34 194.86 0 top
NOREF#177  -  []  273.11 250.23 90 top
NOREF#178  -  []  314.23 187.83 0 top
NOREF#179  -  []  228.15 182.25 0 top
NOREF#180  -  []  253.61 182 90 top
NOREF#181  -  []  192.71 285.68 0 top
NOREF#182  -  []  483.93 190.01 0 top
NOREF#183  -  []  103.28 170.76 0 top
NOREF#184  -  []  272.91 241.11 90 top
NOREF#185  -  []  264.42 176.56 0 top
NOREF#186  -  []  227 201.5 0 top
NOREF#187  -  []  487.88 224.41 90 top
NOREF#188  -  []  305.03 201.06 0 top
NOREF#189  -  []  354.82 285.62 0 top
NOREF#190  -  []  195.75 287.03 90 top
NOREF#191  -  []  297.83 252.37 0 top
NOREF#192  -  []  49.56 267.3 90 top
NOREF#193  -  []  357.14 138.77 90 top
NOREF#194  -  []  456.13 192.66 90 top
NOREF#195  -  []  224.96 136.89 0 top
NOREF#196  -  []  233.07 243.95 90 top
NOREF#197  -  []  312.23 227.99 0 top
NOREF#198  -  []  344.52 291.64 0 top
NOREF#199  -  []  102.34 249.7 0 top
NOREF#200  -  []  229.01 241.77 90 top
NOREF#201  -  []  282.24 135.14 90 top
NOREF#202  -  []  466.83 221.76 0 top
NOREF#203  -  []  130.05 260.06 90 top
NOREF#204  -  []  122.64 246.5 90 top
NOREF#205  -  []  356.61 287.27 90 top
NOREF#206  -  []  349.17 178.73 90 top
NOREF#207  -  []  345.31 200.2 0 top
NOREF#208  -  []  103.28 234.26 0 top
NOREF#209  -  []  239.47 262.2 90 top
NOREF#210  -  []  294.36 194.76 0 top
NOREF#211  -  []  547.34 221.28 0 top
NOREF#212  -  []  267.95 201.38 0 top
NOREF#213  -  []  534.61 222.87 0 top
NOREF#214  -  []  568.42 149.79 0 top
NOREF#215  -  []  115.04 186.2 0 top
NOREF#216  -  []  303.09 232.9 0 top
NOREF#217  -  []  369.83 162.63 90 top
NOREF#218  -  []  264.41 171.76 90 top
NOREF#219  -  []  319.47 260.55 90 top
NOREF#220  -  []  197.04 253.67 0 top
NOREF#221  -  []  320.79 213.43 0 top
NOREF#222  -  []  265.43 295.89 90 top
NOREF#223  -  []  460.48 221.76 0 top
NOREF#224  -  []  462.89 232.77 90 top
NOREF#225  -  []  86.59 252.5 0 top
NOREF#226  -  []  238.82 262.2 0 top
NOREF#227  -  []  348.49 136.9 0 top
NOREF#228  -  []  264.78 202.58 0 top
NOREF#229  -  []  227.75 172.44 90 top
NOREF#230  -  []  361.77 273.73 90 top
NOREF#231  -  []  560.92 164.1 90 top
NOREF#232  -  []  213.09 195.5 0 top
NOREF#233  -  []  253.54 239.12 90 top
NOREF#234  -  []  365.83 169.63 90 top
NOREF#235  -  []  316.89 133.69 0 top
NOREF#236  -  []  348.95 259.88 0 top
NOREF#237  -  []  344.52 287.7 90 top
NOREF#238  -  []  343.09 173.82 0 top
NOREF#239  -  []  271.39 250.05 0 top
NOREF#240  -  []  67.52 246.93 90 top
NOREF#241  -  []  261.26 194.55 0 top
NOREF#242  -  []  314.61 298.76 0 top
NOREF#243  -  []  346.41 194.4 90 top
NOREF#244  -  []  310.5 250.23 90 top
NOREF#245  -  []  231.16 246.31 90 top
NOREF#246  -  []  348.95 262.82 90 top
NOREF#247  -  []  322.43 272.37 0 top
NOREF#248  -  []  41.44 255.11 0 top
NOREF#249  -  []  319.73 246.59 0 top
NOREF#250  -  []  278.17 254.55 90 top
NOREF#251  -  []  198.44 259.04 90 top
NOREF#252  -  []  335.1 274.12 0 top
NOREF#253  -  []  233.35 190.05 0 top
NOREF#254  -  []  253.09 255.5 0 top
NOREF#255  -  []  264.52 287.7 90 top
NOREF#256  -  []  238.82 198.45 0 top
NOREF#257  -  []  228.31 262.82 0 top
NOREF#258  -  []  250.56 240.75 0 top
NOREF#259  -  []  548.24 238.75 0 top
NOREF#260  -  []  293.39 183.61 0 top
NOREF#261  -  []  293.09 195.5 0 top
NOREF#262  -  []  312.7 190.05 0 top
NOREF#263  -  []  253.1 250.39 90 top
NOREF#264  -  []  306.74 298.45 0 top
NOREF#265  -  []  341.21 194.4 0 top
NOREF#266  -  []  106.74 217.95 0 top
NOREF#267  -  []  361.4 259.88 90 top
NOREF#268  -  []  239.47 202.2 90 top
NOREF#269  -  []  232.46 182.42 90 top
NOREF#270  -  []  276.84 261.06 0 top
NOREF#271  -  []  547.34 234.23 0 top
NOREF#272  -  []  266.85 190.05 0 top
NOREF#273  -  []  210.56 235.55 90 top
NOREF#274  -  []  316.61 288.05 0 top
NOREF#275  -  []  482.83 161.06 0 top
NOREF#276  -  []  349.85 184.37 90 top
NOREF#277  -  []  231.71 184.72 0 top
NOREF#278  -  []  242.43 272.37 0 top
NOREF#279  -  []  97.76 165.86 0 top
NOREF#280  -  []  280.83 157.63 90 top
NOREF#281  -  []  374.2 269.34 90 top
NOREF#282  -  []  278.7 260.1 90 top
NOREF#283  -  []  232.8 187.32 90 top
NOREF#284  -  []  483.26 140.63 90 top
NOREF#285  -  []  317.14 144.1 90 top
NOREF#286  -  []  238.17 194.55 90 top
NOREF#287  -  []  347.95 203.72 0 top
NOREF#288  -  []  99.44 282.49 90 top
NOREF#289  -  []  344.78 261.82 0 top
NOREF#290  -  []  85.29 157.1 90 top
NOREF#291  -  []  237.49 201.06 90 top
NOREF#292  -  []  295.01 253.56 90 top
NOREF#293  -  []  78.8 277.9 0 top
NOREF#294  -  []  308.95 259.78 90 top
NOREF#295  -  []  92.94 252.5 0 top
NOREF#296  -  []  192.83 252.81 90 top
NOREF#297  -  []  329.83 203.63 90 top
NOREF#298  -  []  226.56 199.8 0 top
NOREF#299  -  []  307.65 198.45 90 top
NOREF#300  -  []  271.4 186.13 0 top
NOREF#301  -  []  273.35 190.05 0 top
NOREF#302  -  []  232.21 244.43 0 top
NOREF#303  -  []  474.97 2.28 90 top
NOREF#304  -  []  87.69 186.2 0 top
NOREF#305  -  []  348.03 289.54 0 top
NOREF#306  -  []  273.73 183.95 90 top
NOREF#307  -  []  466.08 223.76 0 top
NOREF#308  -  []  466.08 255.51 0 top
NOREF#309  -  []  351.21 185.61 0 top
NOREF#310  -  []  234.95 182.76 0 top
NOREF#311  -  []  352.57 186.5 0 top
NOREF#312  -  []  234.1 286.98 90 top
NOREF#313  -  []  47.19 271.72 90 top
NOREF#314  -  []  352.7 250.05 0 top
NOREF#315  -  []  271.81 181.77 90 top
NOREF#316  -  []  474.12 142.82 0 top
NOREF#317  -  []  272.87 184.43 0 top
NOREF#318  -  []  329.03 276.59 90 top
NOREF#319  -  []  541.61 147.98 0 top
NOREF#320  -  []  463.78 192.81 0 top
NOREF#321  -  []  330.61 175.6 90 top
NOREF#322  -  []  323.06 210.76 90 top
NOREF#323  -  []  198.56 283.09 90 top
NOREF#324  -  []  290.61 187.17 90 top
NOREF#325  -  []  85 290.19 0 top
NOREF#326  -  []  227.65 199.15 90 top
NOREF#327  -  []  312.57 184.24 90 top
NOREF#328  -  []  333.61 193.56 90 top
NOREF#329  -  []  227.91 184.41 90 top
NOREF#330  -  []  270.74 181.59 0 top
NOREF#331  -  []  333.09 183.29 90 top
NOREF#332  -  []  195.51 282.91 90 top
NOREF#333  -  []  347.7 189.57 90 top
NOREF#334  -  []  351.94 247.8 0 top
NOREF#335  -  []  349.28 181.06 0 top
NOREF#336  -  []  298.44 299.07 0 top
NOREF#337  -  []  254.66 192.79 0 top
NOREF#338  -  []  479.53 158.26 0 top
NOREF#339  -  []  334.31 193.56 90 top
NOREF#340  -  []  255.71 182 90 top
NOREF#341  -  []  123.08 170.76 0 top
NOREF#342  -  []  228.09 268.12 0 top
NOREF#343  -  []  313.02 194.4 0 top
NOREF#344  -  []  314.61 298.99 90 top
NOREF#345  -  []  254.66 241.23 0 top
NOREF#346  -  []  230.51 246.17 90 top
NOREF#347  -  []  357.95 141.12 90 top
NOREF#348  -  []  231.78 243.92 90 top
NOREF#349  -  []  58.25 268.08 90 top
NOREF#350  -  []  353.49 295.27 90 top
NOREF#351  -  []  472.43 223.76 0 top
NOREF#352  -  []  310.26 184.4 0 top
NOREF#353  -  []  232.23 167.99 0 top
NOREF#354  -  []  67.52 249.13 90 top
NOREF#355  -  []  351.8 239.17 90 top
NOREF#356  -  []  254.31 193.56 90 top
NOREF#357  -  []  213.09 243.93 0 top
NOREF#358  -  []  317.62 200.2 90 top
NOREF#359  -  []  479.53 190.01 0 top
NOREF#360  -  []  232.87 184.43 0 top
NOREF#361  -  []  272.23 172.39 90 top
NOREF#362  -  []  20.74 133.8 90 top
NOREF#363  -  []  468.26 233.65 0 top
NOREF#364  -  []  108.69 186.2 0 top
NOREF#365  -  []  109.42 143.57 0 top
NOREF#366  -  []  86.59 189 0 top
NOREF#367  -  []  63.39 272.5 0 top
NOREF#368  -  []  79.1 278.23 0 top
NOREF#369  -  []  553.49 163.32 90 top
NOREF#370  -  []  356.29 260.94 90 top
NOREF#371  -  []  309.27 260.08 90 top
NOREF#372  -  []  309.61 185.05 0 top
NOREF#373  -  []  306.33 150.83 0 top
NOREF#374  -  []  242.43 271.37 90 top
NOREF#375  -  []  272.22 181.15 0 top
NOREF#376  -  []  104.54 217.95 0 top
NOREF#377  -  []  312.26 245.64 90 top
NOREF#378  -  []  103.59 183 90 top
NOREF#379  -  []  539.84 233.03 90 top
NOREF#380  -  []  315.64 200.94 0 top
NOREF#381  -  []  476.48 256.31 0 top
NOREF#382  -  []  264.52 285.16 90 top
NOREF#383  -  []  458.47 237.49 90 top
NOREF#384  -  []  225.48 233.73 90 top
NOREF#385  -  []  301.21 254.4 0 top
NOREF#386  -  []  229.3 185.2 0 top
NOREF#387  -  []  363.06 210.76 90 top
NOREF#388  -  []  548.24 223 0 top
NOREF#389  -  []  270.59 240.4 0 top
NOREF#390  -  []  268.09 208.12 0 top
NOREF#391  -  []  240.12 262.82 0 top
NOREF#392  -  []  252.45 178.82 0 top
NOREF#393  -  []  115.04 154.45 0 top
NOREF#394  -  []  495.12 239.96 90 top
NOREF#395  -  []  289.83 203.63 90 top
NOREF#396  -  []  251.16 180.15 0 top
NOREF#397  -  []  294.36 193.12 0 top
NOREF#398  -  []  488.08 190.01 0 top
NOREF#399  -  []  341.82 296.65 90 top
NOREF#400  -  []  279.47 259.15 90 top
NOREF#401  -  []  237.14 138.77 90 top
NOREF#402  -  []  283.36 272.69 0 top
NOREF#403  -  []  271.71 244.72 0 top
NOREF#404  -  []  362.68 272.85 0 top
NOREF#405  -  []  294.38 183.29 0 top
NOREF#406  -  []  276.23 163.88 90 top
NOREF#407  -  []  84.1 279.05 0 top
NOREF#408  -  []  535.51 221.9 90 top
NOREF#409  -  []  311.27 179.68 90 top
NOREF#410  -  []  454.13 190.01 0 top
NOREF#411  -  []  266.45 147.01 90 top
NOREF#412  -  []  124.28 170.11 90 top
NOREF#413  -  []  321.04 135.78 0 top
NOREF#414  -  []  72.69 279.53 0 top
NOREF#415  -  []  83.29 249.7 0 top
NOREF#416  -  []  460.48 158.26 0 top
NOREF#417  -  []  493.48 250.31 90 top
NOREF#418  -  []  546.96 209.34 0 top
NOREF#419  -  []  459.73 255.51 0 top
NOREF#420  -  []  347.95 262.07 0 top
NOREF#421  -  []  275.3 250.05 0 top
NOREF#422  -  []  306.91 146.64 0 top
NOREF#423  -  []  320.76 199.78 90 top
NOREF#424  -  []  269.27 263.12 90 top
NOREF#425  -  []  473.18 190.01 0 top
NOREF#426  -  []  235.06 190.23 90 top
NOREF#427  -  []  305.31 200.2 0 top
NOREF#428  -  []  194.24 252.81 90 top
NOREF#429  -  []  320.76 262.82 90 top
NOREF#430  -  []  283.96 287.7 90 top
NOREF#431  -  []  267.41 134.7 0 top
NOREF#432  -  []  229.53 181.46 90 top
NOREF#433  -  []  279.02 199.8 90 top
NOREF#434  -  []  307.95 199.98 0 top
NOREF#435  -  []  290.56 235.55 90 top
NOREF#436  -  []  271.12 183.92 90 top
NOREF#437  -  []  255.01 253.56 90 top
NOREF#438  -  []  313.63 143.53 0 top
NOREF#439  -  []  534.61 218.68 0 top
NOREF#440  -  []  272.57 184.24 90 top
NOREF#441  -  []  236.84 201.06 0 top
NOREF#442  -  []  350.74 250.05 0 top
NOREF#443  -  []  272.23 167.99 90 top
NOREF#444  -  []  212.45 250.39 0 top
NOREF#445  -  []  304.42 176.56 0 top
NOREF#446  -  []  232.91 178.51 90 top
NOREF#447  -  []  275.69 208.12 90 top
NOREF#448  -  []  97.99 157.1 90 top
NOREF#449  -  []  344.52 286.43 0 top
NOREF#450  -  []  324.17 272.99 0 top
NOREF#451  -  []  49.56 265.1 90 top
NOREF#452  -  []  283.06 210.76 90 top
NOREF#453  -  []  279.47 260.55 90 top
NOREF#454  -  []  194.35 287.03 90 top
NOREF#455  -  []  509.02 228.95 0 top
NOREF#456  -  []  265.48 235.27 0 top
NOREF#457  -  []  122.18 138.68 0 top
NOREF#458  -  []  277.14 146.64 90 top
NOREF#459  -  []  463.78 256.31 0 top
NOREF#460  -  []  277.14 144.1 90 top
NOREF#461  -  []  310.55 134.62 90 top
NOREF#462  -  []  457.43 161.06 0 top
NOREF#463  -  []  265.14 298.99 90 top
NOREF#464  -  []  310.16 184.72 90 top
NOREF#465  -  []  351.48 246.02 90 top
NOREF#466  -  []  535.51 217.71 90 top
NOREF#467  -  []  279.77 259.98 0 top
NOREF#468  -  []  232.45 183.76 90 top
NOREF#469  -  []  309.46 145.44 90 top
NOREF#470  -  []  223.09 233.82 0 top
NOREF#471  -  []  539.65 207.34 0 top
NOREF#472  -  []  333.54 239.12 90 top
NOREF#473  -  []  227.91 242.43 90 top
NOREF#474  -  []  309.27 261.38 90 top
NOREF#475  -  []  268.03 294.87 0 top
NOREF#476  -  []  271.6 181.11 90 top
NOREF#477  -  []  315.12 300.55 0 top
NOREF#478  -  []  295.83 259.63 0 top
NOREF#479  -  []  279.77 261.38 0 top
NOREF#480  -  []  558.12 150.18 0 top
NOREF#481  -  []  40.05 272.89 0 top
NOREF#482  -  []  332.96 194.76 0 top
NOREF#483  -  []  549.06 196.31 90 top
NOREF#484  -  []  362.13 208.37 90 top
NOREF#485  -  []  227.71 249.57 90 top
NOREF#486  -  []  357.09 266.12 90 top
NOREF#487  -  []  354.44 141.43 0 top
NOREF#488  -  []  289.83 222.63 90 top
NOREF#489  -  []  331.64 195.18 0 top
NOREF#490  -  []  227.09 206.12 0 top
NOREF#491  -  []  231.03 245.37 0 top
NOREF#492  -  []  253.09 183.29 90 top
NOREF#493  -  []  212.78 190.69 90 top
NOREF#494  -  []  312.45 183.76 90 top
NOREF#495  -  []  272.57 244.23 90 top
NOREF#496  -  []  350.5 183.72 90 top
NOREF#497  -  []  84.1 291.32 0 top
NOREF#498  -  []  264.78 261.82 0 top
NOREF#499  -  []  345.44 146.16 90 top
NOREF#500  -  []  279.77 202.07 0 top
NOREF#501  -  []  361.96 210.25 0 top
NOREF#502  -  []  80.24 189 0 top
NOREF#503  -  []  307.56 144.79 90 top
NOREF#504  -  []  319.77 261.38 0 top
NOREF#505  -  []  263.95 232.42 90 top
NOREF#506  -  []  264.52 286.43 0 top
NOREF#507  -  []  541.61 166.69 0 top
NOREF#508  -  []  309.28 241.06 0 top
NOREF#509  -  []  348.25 233.12 0 top
NOREF#510  -  []  282.43 272.37 0 top
NOREF#511  -  []  215.16 191.22 90 top
NOREF#512  -  []  223.09 234.38 0 top
NOREF#513  -  []  306.89 260.1 90 top
NOREF#514  -  []  229.27 200.08 90 top
NOREF#515  -  []  269.94 185.61 0 top
NOREF#516  -  []  307.05 134.08 90 top
NOREF#517  -  []  196.91 285.68 0 top
NOREF#518  -  []  305.14 298.99 90 top
NOREF#519  -  []  313.11 183.76 90 top
NOREF#520  -  []  333.1 190.39 90 top
NOREF#521  -  []  270.47 184.57 90 top
NOREF#522  -  []  198.32 285.68 0 top
NOREF#523  -  []  469.03 158.26 0 top
NOREF#524  -  []  306.84 250.05 0 top
NOREF#525  -  []  250.56 180.75 0 top
NOREF#526  -  []  369.03 276.59 90 top
NOREF#527  -  []  194.35 283.09 90 top
NOREF#528  -  []  270.62 247.15 0 top
NOREF#529  -  []  359.77 263.72 0 top
NOREF#530  -  []  309.17 178.73 90 top
NOREF#531  -  []  289.83 263.63 90 top
NOREF#532  -  []  253.22 240.02 0 top
NOREF#533  -  []  334.66 192.79 0 top
NOREF#534  -  []  117.42 240.62 90 top
NOREF#535  -  []  276.61 288.05 0 top
NOREF#536  -  []  88.89 156.45 0 top
NOREF#537  -  []  217.83 252.37 0 top
NOREF#538  -  []  563.28 154.21 90 top
NOREF#539  -  []  285.83 169.63 90 top
NOREF#540  -  []  506.73 212.18 0 top
NOREF#541  -  []  226.84 148.23 90 top
NOREF#542  -  []  312.22 183.1 0 top
NOREF#543  -  []  232.22 243.1 0 top
NOREF#544  -  []  97.42 229.84 0 top
NOREF#545  -  []  341.81 204.2 0 top
NOREF#546  -  []  283.6 213.73 90 top
NOREF#547  -  []  292.45 178.82 0 top
NOREF#548  -  []  352.9 249.57 90 top
NOREF#549  -  []  294.38 243.29 0 top
NOREF#550  -  []  457.43 192.81 0 top
NOREF#551  -  []  239.47 260.55 90 top
NOREF#552  -  []  353.4 299.38 0 top
NOREF#553  -  []  291.16 187.72 90 top
NOREF#554  -  []  357.49 201.06 90 top
NOREF#555  -  []  239.77 263.03 0 top
NOREF#556  -  []  267.66 245.09 0 top
NOREF#557  -  []  104.48 204.4 90 top
NOREF#558  -  []  87.81 196.06 0 top
NOREF#559  -  []  305.33 134.7 0 top
NOREF#560  -  []  359.77 203.03 0 top
NOREF#561  -  []  568.42 147.59 0 top
NOREF#562  -  []  215.16 179.65 90 top
NOREF#563  -  []  275.21 285.21 90 top
NOREF#564  -  []  269.3 185.85 0 top
NOREF#565  -  []  355.81 242.28 90 top
NOREF#566  -  []  194.24 257 90 top
NOREF#567  -  []  192.83 259.04 90 top
NOREF#568  -  []  317.95 138.45 90 top
NOREF#569  -  []  272.7 250.05 0 top
NOREF#570  -  []  358.17 194.55 90 top
NOREF#571  -  []  195.75 281.19 90 top
NOREF#572  -  []  123.08 234.26 0 top
NOREF#573  -  []  480.78 250.31 90 top
NOREF#574  -  []  215.06 254.76 0 top
NOREF#575  -  []  213.29 182.3 90 top
NOREF#576  -  []  458.75 142.24 90 top
NOREF#577  -  []  470.13 224.56 0 top
NOREF#578  -  []  498.43 213.47 90 top
NOREF#579  -  []  230.59 240.4 0 top
NOREF#580  -  []  347.56 144.79 0 top
NOREF#581  -  []  271.8 250.23 90 top
NOREF#582  -  []  87.81 196.06 90 top
NOREF#583  -  []  231.15 250.23 90 top
NOREF#584  -  []  92.33 165.46 90 top
NOREF#585  -  []  252.96 254.76 0 top
NOREF#586  -  []  232.2 286.98 90 top
NOREF#587  -  []  194.48 255.02 90 top
NOREF#588  -  []  491.48 160.26 0 top
NOREF#589  -  []  267.65 258.45 90 top
NOREF#590  -  []  278.82 201.5 0 top
NOREF#591  -  []  344.96 136.11 90 top
NOREF#592  -  []  353.07 240.67 90 top
NOREF#593  -  []  87.81 164.31 0 top
NOREF#594  -  []  474 197.59 0 top
NOREF#595  -  []  312.25 249.57 90 top
NOREF#596  -  []  504.01 210.17 0 top
NOREF#597  -  []  311.16 186.31 90 top
NOREF#598  -  []  224.48 260.94 90 top
NOREF#599  -  []  306.56 199.8 0 top
NOREF#600  -  []  347 262.2 0 top
NOREF#601  -  []  498.43 231.86 90 top
NOREF#602  -  []  231.11 296.5 90 top
NOREF#603  -  []  266.89 200.1 90 top
NOREF#604  -  []  333.39 255.18 0 top
NOREF#605  -  []  473.22 142.49 0 top
NOREF#606  -  []  221.29 297.9 0 top
NOREF#607  -  []  271.78 183.92 90 top
NOREF#608  -  []  271.16 241.77 90 top
NOREF#609  -  []  313.07 194.55 0 top
NOREF#610  -  []  274.82 285.62 0 top
NOREF#611  -  []  322.68 272.85 0 top
NOREF#612  -  []  307.05 135.09 90 top
NOREF#613  -  []  83.29 217.95 0 top
NOREF#614  -  []  234.61 298.99 90 top
NOREF#615  -  []  272.26 241.11 90 top
NOREF#616  -  []  339.9 208.32 90 top
NOREF#617  -  []  276.52 134.08 90 top
NOREF#618  -  []  231.21 185.61 0 top
NOREF#619  -  []  483.93 158.26 0 top
NOREF#620  -  []  271.39 190.05 0 top
NOREF#621  -  []  266.33 150.83 0 top
NOREF#622  -  []  352.23 227.99 0 top
NOREF#623  -  []  254.38 254.86 0 top
NOREF#624  -  []  270.74 190.05 0 top
NOREF#625  -  []  334.38 254.86 0 top
NOREF#626  -  []  233.11 183.76 90 top
NOREF#627  -  []  268.09 268.12 0 top
NOREF#628  -  []  103.28 139.01 0 top
NOREF#629  -  []  222.56 290.86 0 top
NOREF#630  -  []  117.24 217.95 0 top
NOREF#631  -  []  365.95 208.97 90 top
NOREF#632  -  []  229.94 246.38 0 top
NOREF#633  -  []  355.81 182.28 90 top
NOREF#634  -  []  276.16 189.57 90 top
NOREF#635  -  []  318.82 261.5 0 top
NOREF#636  -  []  330.61 192.27 0 top
NOREF#637  -  []  253.29 242.3 90 top
NOREF#638  -  []  356.59 261.82 0 top
NOREF#639  -  []  235.3 250.05 0 top
NOREF#640  -  []  81.69 261.04 90 top
NOREF#641  -  []  307.65 259.15 90 top
NOREF#642  -  []  346.63 247.43 0 top
NOREF#643  -  []  303.27 174.62 0 top
NOREF#644  -  []  344.52 293.03 90 top
NOREF#645  -  []  241.48 208.37 0 top
NOREF#646  -  []  229.94 245.61 0 top
NOREF#647  -  []  315.12 299.54 0 top
NOREF#648  -  []  198.32 284.82 90 top
NOREF#649  -  []  478.69 197.86 90 top
NOREF#650  -  []  279.59 140.38 90 top
NOREF#651  -  []  84.1 289.86 0 top
NOREF#652  -  []  306.91 141.04 90 top
NOREF#653  -  []  560.92 147.59 90 top
NOREF#654  -  []  66.31 248.1 0 top
NOREF#655  -  []  295.58 254.86 90 top
NOREF#656  -  []  290.61 247.17 90 top
NOREF#657  -  []  485.13 223.76 0 top
NOREF#658  -  []  276.61 287.27 90 top
NOREF#659  -  []  485.88 221.76 0 top
NOREF#660  -  []  307.99 241.05 0 top
NOREF#661  -  []  358.37 259.8 0 top
NOREF#662  -  []  124.28 204.4 90 top
NOREF#663  -  []  267.9 184.41 90 top
NOREF#664  -  []  457.43 161.06 0 top
NOREF#665  -  []  546.96 207.94 0 top
NOREF#666  -  []  293.1 250.39 90 top
NOREF#667  -  []  60.8 254.33 90 top
NOREF#668  -  []  215.58 254.86 90 top
NOREF#669  -  []  345.14 298.99 90 top
NOREF#670  -  []  109.42 238.82 0 top
NOREF#671  -  []  330.56 240.75 0 top
NOREF#672  -  []  350.41 240.16 0 top
NOREF#673  -  []  180.33 2.28 90 top
NOREF#674  -  []  233.08 242.62 90 top
NOREF#675  -  []  230.82 180.82 90 top
NOREF#676  -  []  229.01 181.77 90 top
NOREF#677  -  []  308.52 184.61 90 top
NOREF#678  -  []  230.16 185.37 90 top
NOREF#679  -  []  330.56 187.12 90 top
NOREF#680  -  []  352.2 286.98 90 top
NOREF#681  -  []  311.39 250.05 0 top
NOREF#682  -  []  534.61 233.03 0 top
NOREF#683  -  []  274.49 182.93 90 top
NOREF#684  -  []  485.13 255.51 0 top
NOREF#685  -  []  311.16 241.77 90 top
NOREF#686  -  []  280.76 199.78 90 top
NOREF#687  -  []  213.22 178.82 90 top
NOREF#688  -  []  312.35 292.46 90 top
NOREF#689  -  []  106.74 186.2 0 top
NOREF#690  -  []  78.8 276.65 0 top
NOREF#691  -  []  227.65 202.2 90 top
NOREF#692  -  []  231.16 241.77 90 top
NOREF#693  -  []  80.24 157.25 0 top
NOREF#694  -  []  295.38 253.86 90 top
NOREF#695  -  []  213.09 254.86 90 top
NOREF#696  -  []  308.25 174.12 0 top
NOREF#697  -  []  234.37 295.53 90 top
NOREF#698  -  []  228.09 208.12 0 top
NOREF#699  -  []  566.06 170.72 0 top
NOREF#700  -  []  210.56 192.32 0 top
NOREF#701  -  []  267.65 198.45 90 top
NOREF#702  -  []  334.68 183.61 0 top
NOREF#703  -  []  230.75 181.59 0 top
NOREF#704  -  []  306.84 148.23 90 top
NOREF#705  -  []  293.61 182 90 top
NOREF#706  -  []  359.47 261.5 90 top
NOREF#707  -  []  352.26 181.11 90 top
NOREF#708  -  []  226.91 146.64 0 top
NOREF#709  -  []  358.82 202.2 0 top
NOREF#710  -  []  213.32 14.14 90 top
NOREF#711  -  []  292.96 243.2 0 top
NOREF#712  -  []  474.48 169.9 0 top
NOREF#713  -  []  329.83 263.63 90 top
NOREF#714  -  []  276.52 134.86 0 top
NOREF#715  -  []  333.09 194.86 90 top
NOREF#716  -  []  320.79 273.43 0 top
NOREF#717  -  []  343.09 232.9 0 top
NOREF#718  -  []  358.7 200.1 90 top
NOREF#719  -  []  80.24 220.75 0 top
NOREF#720  -  []  268.95 259.88 0 top
NOREF#721  -  []  255.16 239.65 90 top
NOREF#722  -  []  195.88 259.22 90 top
NOREF#723  -  []  224.78 261.82 0 top
NOREF#724  -  []  238.57 171.63 90 top
NOREF#725  -  []  279.47 262.2 90 top
NOREF#726  -  []  295.56 252.47 90 top
NOREF#727  -  []  278.82 202.2 0 top
NOREF#728  -  []  267.21 259.8 90 top
NOREF#729  -  []  237.12 200.2 0 top
NOREF#730  -  []  348.55 178.53 90 top
NOREF#731  -  []  423.56 417.57 90 top
NOREF#732  -  []  269.11 233.64 90 top
NOREF#733  -  []  344.09 172.66 0 top
NOREF#734  -  []  92.94 220.75 0 top
NOREF#735  -  []  274.61 297.98 90 top
NOREF#736  -  []  215.01 253.56 90 top
NOREF#737  -  []  228.95 259.88 0 top
NOREF#738  -  []  345.14 299.77 0 top
NOREF#739  -  []  213.1 250.39 90 top
NOREF#740  -  []  547.86 196.96 0 top
NOREF#741  -  []  312.23 172.39 90 top
NOREF#742  -  []  192.95 283.09 90 top
NOREF#743  -  []  215.71 253.56 90 top
NOREF#744  -  []  356.59 262.58 0 top
NOREF#745  -  []  318.82 202.2 0 top
NOREF#746  -  []  303.83 260.94 0 top
NOREF#747  -  []  114.29 219.95 0 top
NOREF#748  -  []  214.68 242.3 90 top
NOREF#749  -  []  227.65 260.55 90 top
NOREF#750  -  []  81.82 292.7 0 top
NOREF#751  -  []  305.05 146.58 0 top
NOREF#752  -  []  307 259.15 0 top
NOREF#753  -  []  259.9 268.32 90 top
NOREF#754  -  []  222.49 297.25 90 top
NOREF#755  -  []  198.68 257.18 90 top
NOREF#756  -  []  94.04 186.2 0 top
NOREF#757  -  []  332.45 178.82 0 top
NOREF#758  -  []  194.48 257.18 90 top
NOREF#759  -  []  227.03 181.43 90 top
NOREF#760  -  []  215.06 183.2 0 top
NOREF#761  -  []  353.07 242.62 90 top
NOREF#762  -  []  212.01 254.76 0 top
NOREF#763  -  []  362.68 212.85 0 top
NOREF#764  -  []  304.52 291.64 0 top
NOREF#765  -  []  477.58 253.51 0 top
NOREF#766  -  []  493.02 237.74 0 top
NOREF#767  -  []  255.06 243.2 0 top
NOREF#768  -  []  215.58 243.29 90 top
NOREF#769  -  []  346.63 241.83 90 top
NOREF#770  -  []  252.66 193.56 90 top
NOREF#771  -  []  294.66 252.79 0 top
NOREF#772  -  []  311.6 181.11 90 top
NOREF#773  -  []  461.73 218.56 90 top
NOREF#774  -  []  308.67 241.94 0 top
NOREF#775  -  []  213.61 193.56 90 top
